# Altium PCB DB32.PcbDoc (part 6 of 8)
Units mil, origin at the board's own origin, x right, y up, seen from the top; angles counter-clockwise.
Board outline 3236.22 x 4456.69 mil, 8 copper layers (Top Layer, MidLayer1, MidLayer2, GND-Layer5, MidLayer3, VCC, MidLayer4, Bottom Layer), stack 61.8 mil thick; 207 components, 474 nets, 1777 pads, 1474 vias.
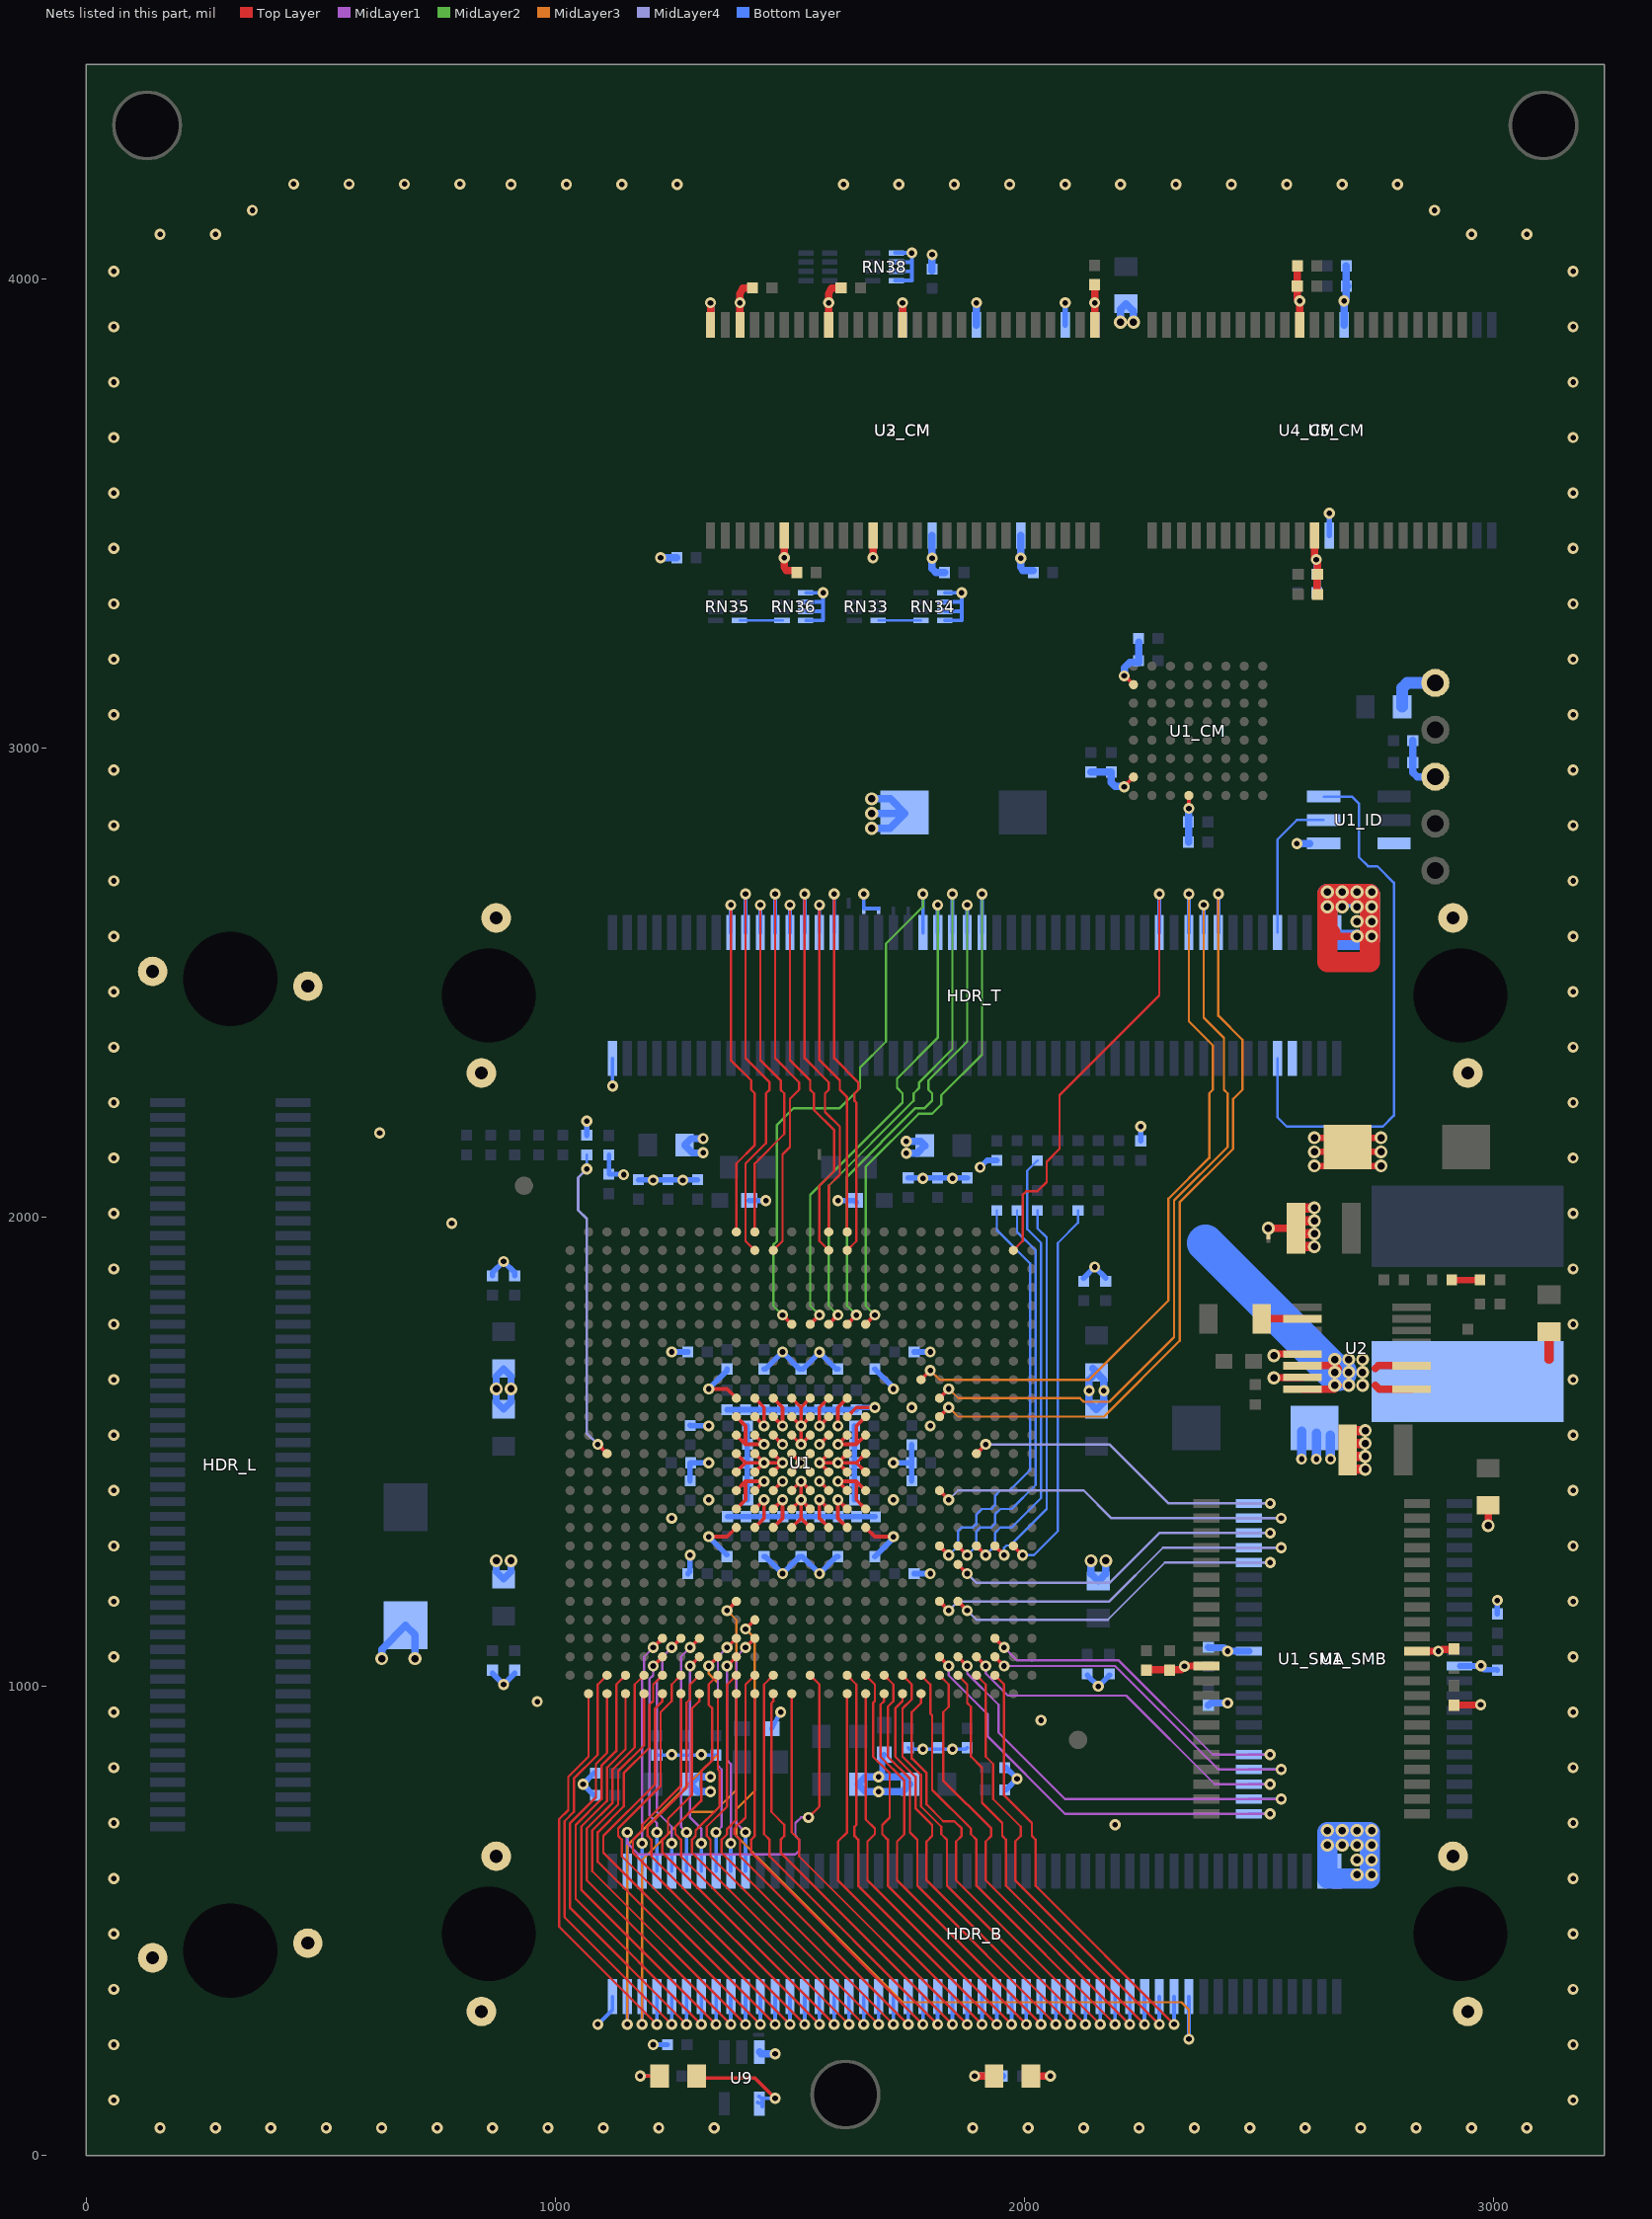
[diagram p12: the nets of this part, all layers, seen from the top]

## Via types
v1: diameter 23.62, hole 11.81, Top Layer to Bottom Layer, 839 vias
v2: diameter 23.62, hole 11.81, Top Layer to Bottom Layer, tented both sides, 499 vias
v3: diameter 27.56, hole 15.75, Top Layer to Bottom Layer, 135 vias
v4: diameter 23.62, hole 11.81, Top Layer to Bottom Layer, tented top, 1 vias

## Nets (pads, with @x,y where several pads share a name; then routed paths per layer and width w, separated by ;. In a path a pad name is that pad's centre, name@x,y a point inside that pad or via, vN(x,y) a via of type N, cw(c..) or ccw(c..) an arc to the next point about the centre after c; other vN are vias at no path point) (continued)
GND: C1_CM.2 C1_FP.2 C1_ID.1 C1_MB.2 C1_PL.2 C1_SMA.2 C1_SMB.2 C2_CM.2 C2_FP.2 C2_ID.2 C2_MB.2 C2_PL.2 C2_SMA.2 C2_SMB.2 C3_CM.2 C3_FP.2 C3_PL.2 C3_SMA.2 C3_SMB.2 C4_CM.2 C4_FP.2 C4_PL.2 C4_SMA.2 C4_SMB.2 C5_CM.2 C5_FP.2 C5_MB.2 C5_PL.2 C6_CM.2 C6_FP.2 C6_PL.2 C7_CM.2 C7_FP.2 C7_PL.2 C8_CM.2 C8_FP.2 C8_PL.2 C9_CM.2 C9_FP.2 C9_PL.2 C10_CM.2 C10_FP.2 C10_PL.2 C11_CM.2 C11_FP.2 C11_PL.2 C12_CM.2 C12_FP.2 C12_PL.2 C13_CM.2 C13_PL.2 C14_CM.2 C14_PL.2 C15.2 C15_CM.2 C15_FP.2 C15_PL.2 C16_CM.2 C16_FP.2 C16_PL.2 C17.2 C17_CM.2 C17_FP.2 C18_CM.2 C18_FP.2 C19.2 C19_CM.2 C19_FP.2 C20.2 C20_CM.2 C20_FP.2 C21_CM.2 C21_FP.2 C22.2 C22_CM.2 C22_FP.2 C23_CM.2 C23_FP.2 C24_CM.2 C24_FP.2 C25_FP.2 C38_FP.2 C39_FP.2 C40_FP.2 C41_FP.2 C42_FP.2 C43_FP.2 C44_FP.2 C45_FP.2 C46_FP.2 C47_FP.2 C48_FP.2 C49_FP.2 C50_FP.2 C51_FP.2 C52_FP.2 C53_FP.2 C54_FP.2 C55_FP.2 C56_FP.2 C62_FP.2 C63_FP.2 C64_FP.2 C65_FP.2 C66_FP.2 C67_FP.2 C68_FP.2 C69_FP.2 C70_FP.2 C71_FP.2 C72_FP.2 C73_FP.2 C74_FP.2 C75_FP.2 C76_FP.2 C77_FP.2 C78_FP.2 C79_FP.2 C80_FP.2 C81_FP.2 C82_FP.2 C83_FP.2 C84_FP.2 C85_FP.2 C86_FP.2 C87_FP.2 C88_FP.2 C89_FP.2 C90_FP.2 C91_FP.2 C92_FP.2 C93_FP.2 C98.1 HDR_B.1 HDR_B.98 HDR_B.100 HDR_B.MH1 HDR_B.MH2 HDR_B.MH3 HDR_B.MH4 HDR_L.MH1 HDR_L.MH2 HDR_L.MH3 HDR_L.MH4 HDR_T.1 HDR_T.98 HDR_T.100 HDR_T.MH1 HDR_T.MH2 HDR_T.MH3 HDR_T.MH4 LED1.2 NT4.2 NT5.2 NT7.2 R5.2 RN34.1 RN34.2 RN34.3 RN34.4 RN36.1 RN36.2 RN36.3 RN36.4 RN38.1 RN38.2 RN38.3 RN38.4 TP0.1 TP2.1 U1.K10 U1.K11 U1.K12 U1.K13 U1.K14 U1.K15 U1.K16 U1.L10 U1.L11 U1.L12 U1.L13 U1.L14 U1.L15 U1.L16 U1.L17 U1.M10 U1.M11 U1.M12 U1.M13 U1.M14 U1.M15 U1.M16 U1.M17 U1.N10 U1.N11 U1.N12 U1.N13 U1.N14 U1.N15 U1.N16 U1.N17 U1.P10 U1.P11 U1.P12 U1.P13 U1.P14 U1.P15 U1.P16 U1.P17 U1.R10 U1.R11 U1.R12 U1.R13 U1.R14 U1.R15 U1.R16 U1.R17 U1.T10 U1.T11 U1.T12 U1.T13 U1.T14 U1.T15 U1.T16 U1.T17 U1.U10 U1.U11 U1.U12 U1.U13 U1.U14 U1.U15 U1.U16 U1.U17 U1_CM.E8 U1_CM.H2 U1_CM.H7 U1_ID.1 U1_SMA.12 U1_SMA.34 U1_SMB.12 U1_SMB.34 U2.13 U2.15 U2_CM.6 U2_CM.12 U2_CM.28 U2_CM.41 U2_CM.46 U2_CM.52 U2_CM.54 U3_CM.6 U3_CM.12 U3_CM.28 U3_CM.41 U3_CM.46 U3_CM.52 U3_CM.54 U4_CM.12 U4_CM.34 U5_CM.12 U5_CM.34 U9.3 | length 14104.8
  Top Layer w7.87: v1(1326.77,1318.9) 1366.14,1318.9 U1.U10@1385.83,1338.58 ; v1(1326.77,1633.86) 1366.14,1633.86 U1.K10@1385.83,1614.17 ; U1.T10@1385.83,1377.95 1405.51,1397.64 1405.51,1437.01 ; U1.R10@1385.83,1417.32 1405.51,1437.01 ; U1.P10@1385.83,1456.69 1405.51,1476.38 ; U1.N10@1385.83,1496.06 1405.51,1476.38 ; U1.M10@1385.83,1535.43 1405.51,1515.75 ; U1.L10@1385.83,1574.8 1405.51,1555.12 1405.51,1515.75 ; U1.U11@1425.2,1338.58 1444.88,1358.27 v1(1444.88,1397.64) U1.T11@1425.2,1377.95 ; U1.R11@1425.2,1417.32 v1(1444.88,1437.01) 1405.51,1437.01 ; U1.P11@1425.2,1456.69 v1(1444.88,1476.38) ; U1.N11@1425.2,1496.06 v1@1444.88,1476.38 ; U1.M11@1425.2,1535.43 v1(1444.88,1515.75) 1405.51,1515.75 ; U1.L11@1425.2,1574.8 v1(1444.88,1555.12) 1444.88,1594.49 U1.K11@1425.2,1614.17 ; U1.U12@1464.57,1338.58 1484.25,1358.27 v1(1484.25,1397.64) U1.T12@1464.57,1377.95 ; U1.R12@1464.57,1417.32 v1(1484.25,1437.01) ; U1.P12@1464.57,1456.69 v1(1484.25,1476.38) ; U1.N12@1464.57,1496.06 v1(1484.25,1476.38) ; U1.M12@1464.57,1535.43 v1(1484.25,1515.75) ; U1.L12@1464.57,1574.8 v1(1484.25,1555.12) 1484.25,1594.49 U1.K12@1464.57,1614.17 ; U1.R13@1503.94,1417.32 v1(1523.62,1437.01) ; U1.P13@1503.94,1456.69 U1.N14@1543.31,1496.06 ; U1.N13@1503.94,1496.06 U1.P14@1543.31,1456.69 ; U1.M13@1503.94,1535.43 v1(1523.62,1515.75) ; U1.L13@1503.94,1574.8 v1(1523.62,1555.12) U1.L14@1543.31,1574.8 ; U1.K13@1503.94,1614.17 1523.62,1594.49 ; U1.U14@1543.31,1338.58 1523.62,1358.27 ; U1.T14@1543.31,1377.95 v1(1523.62,1397.64) ; U1.R14@1543.31,1417.32 v1(1523.62,1437.01) ; U1.M14@1543.31,1535.43 v1(1523.62,1515.75) ; U1.K14@1543.31,1614.17 1523.62,1594.49 ; v1(1562.99,1437.01) U1.R15@1582.68,1417.32 ; v1(1562.99,1515.75) U1.M15@1582.68,1535.43 ; U1.U15@1582.68,1338.58 1562.99,1358.27 v1(1562.99,1397.64) U1.T15@1582.68,1377.95 ; U1.P15@1582.68,1456.69 v1(1562.99,1476.38) ; U1.N15@1582.68,1496.06 v1(1562.99,1476.38) ; U1.L15@1582.68,1574.8 v1(1562.99,1555.12) 1562.99,1594.49 U1.K15@1582.68,1614.17 ; v1(1602.36,1555.12) 1602.36,1594.49 U1.K16@1622.05,1614.17 ; U1.U16@1622.05,1338.58 1602.36,1358.27 v1(1602.36,1397.64) U1.T16@1622.05,1377.95 ; U1.R16@1622.05,1417.32 v1(1602.36,1437.01) 1641.73,1437.01 ; U1.P16@1622.05,1456.69 v1(1602.36,1476.38) ; U1.N16@1622.05,1496.06 v1@1602.36,1476.38 ; U1.M16@1622.05,1535.43 v1(1602.36,1515.75) 1641.73,1515.75 ; U1.L16@1622.05,1574.8 1641.73,1594.49 v1(1681.1,1594.49) ; U1.U17@1661.42,1338.58 1681.1,1318.9 v1(1720.47,1318.9) ; U1.T17@1661.42,1377.95 1641.73,1397.64 1641.73,1437.01 ; U1.R17@1661.42,1417.32 1641.73,1437.01 ; U1.P17@1661.42,1456.69 1641.73,1476.38 ; U1.N17@1661.42,1496.06 1641.73,1476.38 ; U1.M17@1661.42,1535.43 1641.73,1515.75 ; U1.L17@1661.42,1574.8 1641.73,1555.12 1641.73,1515.75 ; v1@2212.6,2918.31 U1_CM.H7@2232.28,2937.99 ; v1@2212.6,3154.53 U1_CM.H2@2232.28,3134.84 ; v1(2350.4,2871.07) U1_CM.E8@2350.39,2898.62 ; 1405.51,1476.38 v1(1444.88,1476.38) ; 1405.51,1476.38 v1@1444.88,1476.38 ; v1@1444.88,1476.38 v1(1484.25,1476.38) ; 1523.62,1358.27 v1(1523.62,1397.64) ; 1523.62,1358.27 U1.U13@1503.94,1338.58 1523.62,1358.27 ; v1(1523.62,1397.64) U1.T13@1503.94,1377.95 v1(1523.62,1397.64) ; v1(1523.62,1397.64) v1(1523.62,1437.01) ; v1(1523.62,1515.75) 1523.62,1594.49 ; v1(1562.99,1476.38) 1641.73,1476.38 ; v1@1602.36,1476.38 1641.73,1476.38
  Top Layer w13.78: v3(2618.11,2109.29) C17.2@2669.08,2109.29 ; v3(2618.11,2139.29) C17.2@2669.08,2139.29 ; v3(2618.11,2169.29) 2669.08,2169.29 C17.2@2689.05,2149.33 C17.2@2673.58,2133.85 ; C17.2@2709.01,2109.29 v3(2759.99,2109.29) ; C17.2@2709.01,2139.29 v3(2759.99,2139.29) ; C17.2@2709.01,2169.29 v3(2759.99,2169.29)
  Top Layer w15: C4_SMA.2@2259.84,1034.45 2260.82,1035.43 2334.65,1035.43 2341,1041.79 v1(2341,1043) 2341.3,1043.3 U1_SMA.34@2387.87,1043.31 ; v3(2531.5,1657.48) 2532.26,1658.25 U2.15@2591.08,1658.25 ; v3(2531.5,1704.72) 2535.43,1708.66 U2.13@2590.55,1708.66 ; U1_SMA.12@2836.69,1074.8 2881.8,1074.8 v1(2882,1075) 2886.02,1075 2889.76,1078.74 2914.47,1078.74 C1_SMA.2@2915.44,1079.71 ; C3_SMA.2@2915.3,957.92 2917.32,957.76 2914.45,960.63 v1(2972.44,960.63)
  Top Layer w15.75: U2_CM.54@1330.71,3901.57 v2(1330.71,3948.82) ; U2_CM.52@1393.7,3901.57 v2(1393.7,3948.82) ; v2@1393.7,3944.88 1393.7,3964.57 ; 1393.7,3968.51 1399.61,3980.32 C7_CM.2@1420.27,3980.31 ; C7_CM.2@1416.34,3980.32 C7_CM.2@1418.31,3978.34 ; U2_CM.6@1488.19,3452.76 1488.19,3409.45 v2(1488.19,3405.51) 1488.19,3385.83 1492.13,3377.95 C10_CM.2@1514.76,3377.95 ; U2_CM.46@1582.68,3901.57 v2(1582.68,3948.82) ; v2@1582.68,3944.88 1582.68,3964.57 1582.68,3968.51 1588.58,3980.32 C8_CM.2@1609.25,3980.31 ; v2(1677.17,3405.51) U2_CM.12@1677.17,3452.76 ; U2_CM.41@1740.16,3901.57 v2(1740.16,3948.82) ; LED1.2@2011.81,169.29 v1(2055.12,169.29) ; U2_CM.28@2149.61,3901.57 C9_CM.2@2149.6,3987.2 ; v3(2519.68,1976.38) C15.2@2582.67,1976.38 ; C16_CM.2@2581.69,4027.55 2581.69,3957.68 v2(2586.61,3952.76) U4_CM.34@2586.61,3901.57 ; U4_CM.12@2618.11,3452.76 2618.11,3405.51 2624.72,3398.9 C17_CM.2@2624.72,3370.07 C17_CM.2@2625.71,3371.06 ; C15_CM.2@2623.74,3329.72 C17_CM.2@2623.74,3370.07 ; 2645.67,2598.43 v3(2708.66,2598.43) ; v3(2988.19,1342.52) C19.2@2988.18,1385.82
  Top Layer w19.68: 2645.67,2551.18 2649.61,2555.12 ; 3118.09,1696.83 C22.2@3118.1,1755.9
  Top Layer w20: C15.2@2578.73,1937 v3(2618.1,1937) ; C15.2@2578.73,1964.56 v3(2618.1,1964.56) ; C15.2@2578.73,1992.12 v3(2618.1,1992.12) ; C15.2@2578.73,2019.68 v3(2618.1,2019.68) ; C20.2@2687.01,1462.59 v3(2726.38,1462.59) ; C20.2@2687.01,1490.15 v3(2726.38,1490.15) ; C20.2@2687.01,1517.71 v3(2726.38,1517.71) ; C20.2@2687.01,1545.27 v3(2726.38,1545.27)
  Top Layer w39.37: 2645.67,2606.3 2653.54,2606.3
  Top Layer w43.31: 2645.67,2547.24 2649.61,2543.31 ; 2645.67,2543.31 2736.22,2543.31 2736.22,2688.98 2645.67,2688.98 2645.67,2543.31
  Bottom Layer w5: v2@1121.06,2278.54 v2(1122.05,2279.53)
  Bottom Layer w7.87: v2(1090.55,279.53) 1122.05,311.02 HDR_B.1@1122.05,338.58 ; v2(1122.05,2279.53) HDR_T.1@1122.05,2338.58 ; C4_PL.2@1216.53,853.34 C2_PL.2@1342.52,853.34 ; RN36.4@1534.64,3271.65 1570.87,3271.65 v1(1570.87,3330.71) RN36.1@1534.64,3330.71 ; RN36.3@1534.64,3291.34 1570.87,3291.34 ; RN36.2@1534.64,3311.02 1570.87,3311.02 ; v2(1657.48,2688.98) 1657.48,2657.48 NT4.2@1688.98,2657.48 ; RN38.4@1723.62,3996.06 1759.84,3996.06 v1(1759.84,4055.12) RN38.1@1723.62,4055.12 ; RN38.3@1723.62,4015.75 1759.84,4015.75 ; RN38.2@1723.62,4035.43 1759.84,4035.43 ; C14_PL.2@1751.97,869.09 1754.92,866.14 1875,866.14 C16_PL.2@1877.95,869.09 ; RN34.4@1829.92,3271.65 1866.14,3271.65 v1(1866.14,3330.71) RN34.1@1829.92,3330.71 ; RN34.3@1829.92,3291.34 1866.14,3291.34 ; RN34.2@1829.92,3311.02 1866.14,3311.02
  Bottom Layer w9.84: C81_FP.2@1114.17,2132.87 C80_FP.2@1114.17,2091.53 1144.69,2091.53 v1(1145.67,2090.55) ; v1(1208.66,236.22) C98.1@1239.17,236.22 ; C1_PL.2@1460.63,909.45 v1(1480.31,944.88)
  Bottom Layer w11.81: C85_FP.2@866.14,1027.56 v2(889.76,1003.94) C84_FP.2@913.39,1027.56 ; C82_FP.2@866.14,1875 866.14,1881.89 v2(889.76,1905.51) 913.38,1881.89 C83_FP.2@913.38,1875 ; R5.2@1066.93,2174.72 v1(1066.93,2204.72) ; C86_FP.2@1082.68,767.71 v2(1059.06,791.34) C87_FP.2@1082.68,814.96 ; C12_PL.2@1177.16,2079.72 C10_PL.2@1303.15,2079.72 ; v1(1248.03,1712.6) C19_FP.2@1282.48,1712.59 ; C4_FP.2@1282.48,1240.16 1287.4,1245.08 v1(1287.4,1279.53) ; C15_FP.2@1287.4,1437.99 1287.4,1475.39 C24_FP.2@1288.38,1476.37 v1@1326.77,1476.37 ; C25_FP.2@1287.4,1556.1 1288.38,1555.12 v1(1326.77,1555.12) ; v1(1326.77,1318.9) 1365.16,1280.51 C16_FP.2@1366.14,1280.51 ; v1(1326.77,1633.86) 1366.14,1673.23 C12_FP.2@1366.14,1676.18 ; C69_FP.2@1366.14,1589.56 C64_FP.2@1641.73,1589.56 1646.65,1594.49 v1(1681.1,1594.49) ; C73_FP.2@1366.82,1361.64 C63_FP.2@1681.78,1361.64 ; C65_FP.2@1409.45,1397.63 C54_FP.2@1409.45,1555.12 ; C9_PL.2@1417.33,2035.43 C9_PL.2@1413.39,2035.43 v1(1448.82,2035.43) ; C5_FP.2@1444.88,1276.57 1447.84,1276.57 v1(1484.25,1240.16) 1520.67,1276.57 1526.58,1276.57 v1(1562.99,1240.16) 1599.41,1276.57 C6_FP.2@1602.36,1276.57 ; C23_FP.2@1444.88,1676.18 1447.83,1676.18 v1(1484.25,1712.6) 1520.67,1676.18 1527.16,1676.18 v1(1562.99,1712.01) 1598.82,1676.18 C22_FP.2@1602.36,1676.18 ; v1(1602.36,2035.43) C5_PL.2@1637.79,2035.43 ; C5_PL.2@1629.92,2035.43 C5_PL.2@1637.79,2035.43 ; C76_FP.2@1637.8,1397.64 C56_FP.2@1637.8,1555.12 ; C5_PL.2@1641.73,2031.49 C5_PL.2@1637.79,2035.43 ; C18_FP.2@1681.1,1276.57 1720.47,1315.95 v1(1720.47,1318.9) ; C10_FP.2@1681.1,1676.18 1720.47,1636.8 v1(1720.47,1633.86) ; v1(1688.98,807.09) 1696.85,814.96 1696.85,850.39 C13_PL.2@1700.78,854.33 ; v1(1720.47,1476.38) C20_FP.2@1758.85,1476.38 ; C6_PL.2@1751.97,2083.66 C8_PL.2@1877.95,2083.66 ; C8_FP.2@1759.84,1437.99 1759.84,1475.39 C20_FP.2@1758.85,1476.37 ; C9_FP.2@1759.84,1514.76 1759.84,1477.36 C20_FP.2@1758.85,1476.37 ; C7_FP.2@1764.76,1240.16 v1(1799.21,1240.16) ; C21_FP.2@1764.76,1712.6 v1(1799.21,1712.6) ; v2(1905.51,2106.3) 1920.27,2121.06 C79_FP.2@1940.94,2121.06 ; C88_FP.2@1960.63,779.53 v2(1984.25,803.15) C89_FP.2@1960.63,826.77 ; U3_CM.52@2086.61,3901.57 v2(2086.61,3948.82) ; C93_FP.2@2125.98,1870.08 v2(2149.61,1893.7) C92_FP.2@2173.23,1870.08 ; C91_FP.2@2133.86,1023.62 v2(2157.48,1000) C90_FP.2@2181.1,1023.62 ; U3_CM.54@2149.61,3901.57 v2(2149.61,3948.82) ; C78_FP.2@2248.03,2162.4 v2(2248.03,2192.91) ; U5_CM.12@2649.61,3452.76 v2(2649.61,3500) ; U1_SMB.34@2927.25,1043.3 v1@2972.3,1043.3 ; v1(2973,1044) v1@2972.3,1043.3 ; C4_SMB.2@3007.87,1034.45 3006.88,1035.43 2979.33,1035.43 2972.3,1042.47 v1@2972.3,1043.3 ; C2_SMB.2@3007.87,1154.53 v1(3007.87,1183.07)
  Bottom Layer w15: C1_MB.2@661.42,1110.59 C1_MB.2@680.83,1130 700.79,1110.04 v3(700.79,1059.06) ; v3(874.02,1267.72) 874.02,1244.09 C41_FP.2@889.76,1228.34 905.51,1244.09 v3(905.51,1267.72) ; v1@1314.96,2137.14 1291.99,2137.14 C38_FP.2@1275.59,2153.54 1289.29,2167.24 v1(1315.08,2167.24) ; v2(1330.71,775.59) 1303.15,775.59 C45_FP.2@1287.4,791.34 1303.15,807.09 v2(1330.71,807.09) ; v1@1748.03,2139.93 1748.03,2132.31 v1(1748.27,2136.26) ; v1(1748.27,2136.26) 1771.23,2136.24 C40_FP.2@1787.52,2152.54 ; C1_SMB.2@2391.82,959.64 2396.75,964.57 v1(2433.07,964.57) ; C3_SMB.2@2391.82,1083.65 2392.8,1082.68 2425.2,1082.68 v1@2432.87,1075 ; v1(2433,1075) 2433.21,1074.79 U1_SMB.12@2478.43,1074.8 ; C1_FP.2@874.02,1606.29 C1_FP.2@889.76,1590.55 905.51,1606.3 905.51,1661.41 C39_FP.2@889.76,1677.16 874.02,1661.42 C1_FP.2@874.02,1606.29 ; C2_FP.2@1645.67,791.34 1661.41,775.59 1740.16,775.59 C44_FP.2@1755.9,791.34 1740.15,807.09 1661.42,807.09 C2_FP.2@1645.67,791.34
  Bottom Layer w15.75: v3(629.92,1059.06) 629.92,1079.09 C1_MB.2@680.83,1130 ; v2(1224.41,3405.51) C13_CM.2@1258.85,3405.51 ; U3_CM.28@1330.71,3901.57 v2@1330.71,3944.88 ; U9.3@1435.04,220.47 1438.97,216.54 v1(1468.5,216.54) ; v3(1674.21,2828.74) 1713.39,2828.74 1745.15,2860.51 1713.93,2891.73 v3(1674.21,2891.73) ; v3(1674.21,2860.24) C2_MB.2@1744.88,2860.24 ; U3_CM.41@1740.16,3901.57 v2(1740.16,3948.82) ; v1(1748.03,2161.42) 1778.65,2161.42 C40_FP.2@1787.52,2152.54 ; U3_CM.12@1803.15,3452.76 1803.15,3405.51 v2(1803.15,3404.53) 1803.15,3381.89 1811.04,3374.01 C12_CM.2@1829.72,3374.01 ; C14_CM.2@1803.15,4016.72 1803.15,4047.24 v2(1803.15,4051.18) ; U3_CM.46@1897.64,3901.57 v2(1897.64,3948.82) v2@1897.64,3944.88 ; U3_CM.6@1992.13,3452.76 1992.13,3385.83 1996.06,3377.95 C11_CM.2@2018.7,3377.95 ; v3(2141.73,1267.72) 2141.73,1240.15 C43_FP.2@2157.48,1224.41 2161.42,1228.35 2173.23,1240.16 v3(2173.23,1267.72) ; C4_CM.2@2141.73,2948.82 C1_CM.2@2185.04,2948.82 2185.04,2926.19 2192.92,2918.31 v1@2212.6,2918.31 ; C42_FP.2@2145.66,1677.16 2169.29,1653.54 2169.29,1606.3 C3_FP.2@2153.54,1590.55 2137.8,1606.29 2137.8,1653.54 C42_FP.2@2153.54,1669.29 ; v3(2204.72,3907.48) 2204.72,3935.04 C24_CM.2@2216.53,3946.84 2232.28,3931.1 v3(2232.28,3907.48) ; v1(2212.6,3153.54) 2212.6,3170.28 2224.41,3182.09 2243.11,3182.09 C6_CM.2@2243.11,3225.39 ; C5_CM.2@2349.4,2799.21 2350.4,2800.2 v1(2350.4,2871.07) ; v2(2580.71,2796.26) 2608.06,2796.26 U1_ID.1@2608.25,2796.45 ; v2(2622.05,3401.57) 2623.03,3400.6 C19_CM.2@2623.03,3330.7 ; v2@2681.1,3956.7 v2(2681.1,3952.76) 2686.02,3957.67 C22_CM.2@2686.02,3984.25 ; U5_CM.34@2681.38,3901.57 v2@2681.38,3944.88 ; C20_CM.2@2686.02,4027.55 2686.02,3987.2 C22_CM.2@2688.98,3984.25 ; C1_ID.1@2827.75,3015.74 2827.75,2947.84 2836.92,2938.67 TP2.1@2875.71,2938.66
  Bottom Layer w20: v1(2590.55,1484.25) C5_MB.2@2590.55,1543.31 ; v1(2622.05,1484.25) C5_MB.2@2622.05,1539.37 ; v1(2652.34,1484.25) C5_MB.2@2652.34,1535.44
  Bottom Layer w25: C23_CM.2@2805.12,3087.59 2805.12,3127.96 2815.83,3138.67 TP0.1@2875.71,3138.67
  Bottom Layer w43.31: v3@2649.61,681.1 v3@2736.22,681.1 ; v3@2649.61,2681.1 v3@2736.22,2681.1 ; v3@2736.22,681.1 2736.22,661.42 2736.22,629.92 2736.22,598.42 2736.22,590.55 2645.67,590.55 2645.67,688.98 2736.22,688.98 v3@2736.22,681.1 ; v3@2736.22,2681.1 2736.22,2661.42 2736.22,2629.92 2736.22,2598.43 2736.22,2590.55 2645.67,2590.55 2645.67,2688.98 2736.22,2688.98 v3@2736.22,2681.1
  other v1: 157.48,59.06 275.59,59.06 393.7,59.06 511.81,59.06 629.92,59.06 748.03,59.06 866.14,59.06 984.25,59.06 1102.36,59.06 1220.47,59.06 1338.58,59.06 1889.76,59.06 2007.87,59.06 2125.98,59.06 2244.09,59.06 2362.2,59.06 2480.31,59.06 2598.43,59.06 2716.54,59.06 2834.65,59.06 2952.76,59.06 3070.87,59.06 59.06,118.11 3169.29,118.11 59.06,236.22 3169.29,236.22 59.06,354.33 3169.29,354.33 59.06,472.44 3169.29,472.44 59.06,590.55 3169.29,590.55 59.06,708.66 3169.29,708.66 1688.98,775.59 59.06,826.77 3169.29,826.77 1783.46,866.14 1846.46,866.14 59.06,944.88 3169.29,944.88 961.57,967.47 59.06,1062.99 3169.29,1062.99 59.06,1181.1 3169.29,1181.1 59.06,1299.21 3169.29,1299.21 1248.03,1358.27 1326.77,1397.64 1720.47,1397.64 59.06,1417.32 3169.29,1417.32 1326.77,1476.38 1523.62,1476.38 59.06,1535.43 3169.29,1535.43 1799.21,1555.12 1759.84,1594.49 2137.8,1629.92 2169.29,1629.92 59.06,1653.54 3169.29,1653.54 59.06,1771.65 3169.29,1771.65 59.06,1889.76 3169.29,1889.76 779.24,1986.9 59.06,2007.87 3169.29,2007.87 1208.66,2078.74 1271.65,2078.74 1783.46,2082.68 1846.46,2082.68 59.06,2125.98 3169.29,2125.98 1315.08,2137.24 625.7,2179.57 59.06,2244.09 3169.29,2244.09 59.06,2362.2 3169.29,2362.2 59.06,2480.31 3169.29,2480.32 59.06,2598.43 3169.29,2598.43 59.06,2716.54 3169.29,2716.54 59.06,2834.65 3169.29,2834.65 2212.6,2917.32 59.06,2952.76 3169.29,2952.76 59.06,3070.87 3169.29,3070.87 59.06,3188.98 3169.29,3188.98 59.06,3307.09 3169.29,3307.09 59.06,3425.2 3169.29,3425.2 59.06,3543.31 3169.29,3543.31 59.06,3661.42 3169.29,3661.42 59.06,3779.53 3169.29,3779.53 59.06,3897.64 3169.29,3897.64 59.06,4015.75 3169.29,4015.75 157.48,4094.49 275.59,4094.49 2952.76,4094.49 3070.87,4094.49 354.33,4145.67 2874.02,4145.67 905.51,4200.79 1023.62,4200.79 1141.73,4200.79 1259.84,4200.79 1614.17,4200.79 1732.28,4200.79 1850.39,4200.79 1968.5,4200.79 2086.61,4200.79 2204.72,4200.79 2322.83,4200.79 2440.94,4200.79 2559.06,4200.79 2677.17,4200.79 2795.28,4200.79 442.21,4201.8 560.32,4201.8 678.43,4201.8 796.54,4201.8
  other v2: 2193.14,704.91 1248.03,854.33 1311.02,854.33 2035.41,927.64 1992.13,3404.53
  other v3: 2708.66,598.42 2740.16,598.42 2708.66,629.92 2740.16,629.92 2645.67,661.42 2677.17,661.42 2708.66,661.42 2740.16,661.42 2645.67,692.91 2677.17,692.91 2708.66,692.91 2740.16,692.91 874.02,1633.86 905.51,1633.86 2740.16,2598.43 2708.66,2629.92 2740.16,2629.92 2645.67,2661.42 2677.17,2661.42 2708.66,2661.42 2740.16,2661.42 2645.67,2692.91 2677.17,2692.91 2708.66,2692.91 2740.16,2692.91
INITN: R8.2 U1.V25 | length 825.3
  Top Layer w7.87: U1.V25@1976.38,1299.21 v1(1996.07,1279.53)
  Bottom Layer w5: v1(1996.07,1279.53) 2019.68,1279.53 2070.87,1330.71 2070.87,1944.88 2114.17,1988.18 R8.2@2114.17,2014.25
IO0: HDR_B.7 U1.AF2 | length 876.3
  Top Layer w5: U1.AF2@1070.87,984.25 1070.87,921.26 1070.87,909.45 1070.87,850.39 1027.56,807.09 1027.56,736.22 1007.87,716.54 1007.87,488.19 v2(1216.54,279.53)
  Bottom Layer w7.87: v2(1216.54,279.53) HDR_B.7@1216.54,338.58
IO1: HDR_B.9 U1.AE3 | length 935.2
  Top Layer w5: U1.AE3@1110.24,1023.62 1090.55,1003.94 1090.55,921.26 1090.55,909.45 1090.55,854.33 1039.37,803.15 1039.37,732.28 1019.68,712.6 1019.68,507.87 v2(1248.03,279.53)
  Bottom Layer w7.87: v2(1248.03,279.53) HDR_B.9@1248.03,338.58
IO2: HDR_B.11 U1.AF3 | length 899.1
  Top Layer w5: U1.AF3@1110.24,984.25 1110.24,921.26 1110.24,909.45 1110.24,858.27 1086.61,834.65 1086.61,763.78 1031.5,708.66 1031.5,527.56 v2(1279.53,279.53)
  Bottom Layer w7.87: v2(1279.53,279.53) HDR_B.11@1279.53,338.58
IO3: HDR_B.13 U1.AE4 | length 958.1
  Top Layer w5: U1.AE4@1149.61,1023.62 1129.92,1003.94 1129.92,983.27 1129.92,941.93 1129.92,921.26 1129.92,909.45 1129.92,862.2 1098.43,830.71 1098.43,759.84 1043.31,704.72 1043.31,547.24 v2(1311.02,279.53)
  Bottom Layer w7.87: v2(1311.02,279.53) HDR_B.13@1311.03,338.58
IO4: HDR_B.15 U1.AF4 | length 922
  Top Layer w5: U1.AF4@1149.61,984.25 1149.61,921.26 1149.61,909.45 1149.61,866.14 1110.24,826.77 1110.24,755.91 1055.12,700.79 1055.12,566.93 v2(1342.52,279.53)
  Bottom Layer w7.87: v2(1342.52,279.53) HDR_B.15@1342.52,338.58
IO5: HDR_B.17 U1.AE5 | length 980.9
  Top Layer w5: U1.AE5@1188.98,1023.62 1169.29,1003.94 1169.29,983.27 1169.29,941.93 1169.29,921.26 1169.29,909.45 1169.29,870.08 1122.05,822.83 1122.05,751.97 1066.93,696.85 1066.93,586.61 v2(1374.02,279.53)
  Bottom Layer w7.87: v2(1374.02,279.53) HDR_B.17@1374.02,338.58
IO6: HDR_B.19 U1.AF5 | length 944.8
  Top Layer w5: U1.AF5@1188.98,984.25 1188.98,921.26 1188.98,909.45 1188.98,874.02 1133.86,818.9 1133.86,748.03 1078.74,692.91 1078.74,606.3 v2(1405.51,279.53)
  Bottom Layer w7.87: v2(1405.51,279.53) HDR_B.19@1405.51,338.58
IO7: HDR_B.21 U1.AE6 | length 1003.7
  Top Layer w5: U1.AE6@1228.35,1023.62 1208.66,1003.94 1208.66,968.5 1200.79,960.63 1200.79,921.26 1200.79,909.45 1200.79,870.08 1145.67,814.96 1145.67,744.09 1090.55,688.98 1090.55,625.98 v2(1437.01,279.53)
  Bottom Layer w7.87: v2(1437.01,279.53) HDR_B.21@1437.01,338.58
IO8: HDR_B.23 U1.AF6 | length 967.6
  Top Layer w5: U1.AF6@1228.35,984.25 1228.35,968.5 1212.6,952.75 1212.6,921.26 1212.6,909.45 1212.6,791.34 1102.36,681.1 1102.36,645.67 v2(1468.5,279.53)
  Bottom Layer w7.87: v2(1468.5,279.53) HDR_B.23@1468.51,338.58
IO9: HDR_B.25 U1.AE7 | length 1010.3
  Top Layer w5: U1.AE7@1267.72,1023.62 1248.03,1003.94 1248.03,968.5 1224.41,944.88 1224.41,921.26 1224.41,909.45 1224.41,787.4 1133.86,696.85 1133.86,681.1 1141.73,673.23 1141.73,637.79 v2(1500,279.53)
  Bottom Layer w7.87: v2(1500,279.53) HDR_B.25@1500,338.58
IO10: HDR_B.27 U1.AF7 | length 957.8
  Top Layer w5: U1.AF7@1267.72,984.25 1267.72,921.26 1267.72,909.45 1267.72,787.4 1185.04,704.72 1185.04,692.91 1165.35,673.23 1165.35,645.67 v2(1531.5,279.53)
  Bottom Layer w7.87: v2(1531.5,279.53) HDR_B.27@1531.5,338.58
IO11: HDR_B.29 U1.AE8 | length 1000.5
  Top Layer w5: U1.AE8@1307.09,1023.62 1287.4,1003.94 1287.4,983.27 1287.4,972.93 1279.53,965.06 1279.53,921.26 1279.53,909.45 1279.53,783.71 1196.85,701.03 1196.85,681.1 1204.72,673.23 1204.72,637.79 v2(1562.99,279.53)
  Bottom Layer w7.87: v2(1562.99,279.53) HDR_B.29@1562.99,338.58
IO12: HDR_B.31 U1.AF8 | length 948.1
  Top Layer w5: U1.AF8@1307.09,984.25 1307.09,968.5 1291.34,952.75 1291.34,921.26 1291.34,909.45 1291.34,768.7 1240.16,717.52 1240.16,685.04 1228.35,673.23 1228.35,645.67 v2(1594.49,279.53)
  Bottom Layer w7.87: v2(1594.49,279.53) HDR_B.31@1594.49,338.58
IO13: HDR_B.33 U1.AE9 | length 1000.5
  Top Layer w5: U1.AE9@1346.46,1023.62 1326.77,1003.94 1326.77,960.63 1334.65,952.76 1334.65,921.26 1334.64,909.45 1334.64,842.52 1311.02,818.9 1311.02,755.91 1255.91,700.79 1255.91,685.04 1267.72,673.23 1267.72,637.79 v2(1625.99,279.53)
  Bottom Layer w7.87: v2(1625.99,279.53) HDR_B.33@1625.99,338.58
IO14: HDR_B.35 U1.AF9 | length 941.5
  Top Layer w5: U1.AF9@1346.46,984.25 1346.46,921.26 1346.46,909.45 1346.46,822.83 1350.39,818.9 1350.39,744.09 1299.21,692.91 1299.21,681.1 1291.34,673.23 1291.34,645.67 v2(1657.48,279.53)
  Bottom Layer w7.87: v2(1657.48,279.53) HDR_B.35@1657.48,338.58
IO15: HDR_B.37 U1.AE10 | length 980.9
  Top Layer w5: U1.AE10@1385.83,1023.62 1366.14,1003.94 1366.14,921.26 1366.14,909.45 1366.14,744.09 1322.83,700.79 1322.83,681.1 1330.71,673.23 1330.71,637.79 v2(1688.98,279.53)
  Bottom Layer w7.87: v2(1688.98,279.53) HDR_B.37@1688.98,338.58
IO16: HDR_B.39 U1.AF10 | length 928.5
  Top Layer w5: U1.AF10@1385.83,984.25 1385.83,921.26 1385.83,909.45 1385.83,715.92 1366.14,696.24 1366.14,685.04 1354.33,673.23 1354.33,645.67 v2(1720.47,279.53)
  Bottom Layer w7.87: v2(1720.47,279.53) HDR_B.39@1720.48,338.58
IO17: HDR_B.41 U1.AE11 | length 974.4
  Top Layer w5: U1.AE11@1425.2,1023.62 1405.51,1003.93 1405.51,921.26 1405.51,909.45 1405.51,720.47 1381.89,696.85 1381.89,685.04 1393.7,673.23 1393.7,637.79 v2(1751.97,279.53)
  Bottom Layer w7.87: v2(1751.97,279.53) HDR_B.41@1751.97,338.58
IO18: HDR_B.43 U1.AF11 | length 918.7
  Top Layer w5: U1.AF11@1425.2,984.25 1425.2,921.26 1425.2,909.45 1425.2,681.1 1417.32,673.23 1417.32,645.67 v2(1783.47,279.53)
  Bottom Layer w7.87: v2(1783.47,279.53) HDR_B.43@1783.47,338.58
IO19: HDR_B.45 U1.AE12 | length 964.6
  Top Layer w5: U1.AE12@1464.57,1023.62 1444.88,1003.94 1444.88,921.26 1444.88,909.45 1444.88,685.04 1456.69,673.23 1456.69,637.79 v2(1814.96,279.53)
  Bottom Layer w7.87: v2(1814.96,279.53) HDR_B.45@1814.96,338.58
IO20: HDR_B.47 U1.AF12 | length 931.8
  Top Layer w5: U1.AF12@1464.57,984.25 1464.57,968.5 1460.63,964.57 1460.63,921.26 1460.63,909.45 1460.63,732.28 1488.19,704.72 1488.19,681.1 1480.31,673.23 1480.31,645.67 v2(1846.46,279.53)
  Bottom Layer w7.87: v2(1846.46,279.53) HDR_B.47@1846.46,338.58
IO21: HDR_B.49 U1.AF13 | length 918.7
  Top Layer w5: U1.AF13@1503.94,984.25 1503.94,921.26 1503.94,909.45 1503.94,688.98 1519.69,673.23 1519.69,637.79 v2(1877.95,279.53)
  Bottom Layer w7.87: v2(1877.95,279.53) HDR_B.49@1877.96,338.58
IO22: HDR_B.51 U1.AF16 | length 899.1
  Top Layer w5: U1.AF16@1622.05,984.25 1622.05,921.26 1622.05,909.45 1622.05,688.98 1602.36,669.29 1602.36,586.61 v2(1909.45,279.53)
  Bottom Layer w7.87: v2(1909.45,279.53) HDR_B.51@1909.45,338.58
IO23: HDR_B.53 U1.AE16 | length 938.5
  Top Layer w5: U1.AE16@1622.05,1023.62 1641.73,1003.93 1641.73,921.26 1641.73,909.45 1641.73,704.72 1637.8,700.79 1637.8,681.1 1645.67,673.23 1645.67,574.8 v2(1940.95,279.53)
  Bottom Layer w7.87: v2(1940.95,279.53) HDR_B.53@1940.95,338.58
IO24: HDR_B.55 U1.AF17 | length 905.7
  Top Layer w5: U1.AF17@1661.42,984.25 1661.42,921.26 1661.42,909.45 1661.42,716.54 1681.1,696.85 1681.1,685.04 1665.35,669.29 1665.35,586.61 v2(1972.44,279.53)
  Bottom Layer w7.87: v2(1972.44,279.53) HDR_B.55@1972.44,338.58
IO25: HDR_B.57 U1.AE17 | length 961.3
  Top Layer w5: U1.AE17@1661.42,1023.62 1681,1004.04 1681,968.4 1677.17,964.57 1677.17,921.26 1677.17,909.45 1677.17,850.39 1712.6,814.96 1712.6,720.47 1696.85,704.72 1696.85,685.04 1708.66,673.23 1708.66,574.8 v2(2003.94,279.53)
  Bottom Layer w7.87: v2(2003.94,279.53) HDR_B.57@2003.94,338.58
IO26: HDR_B.59 U1.AF18 | length 922
  Top Layer w5: U1.AF18@1700.79,984.25 1700.79,968.5 1692.91,960.63 1692.91,921.26 1692.91,909.45 1692.91,850.39 1744.09,799.21 1744.09,685.04 1728.35,669.29 1728.35,586.61 v2(2035.43,279.53)
  Bottom Layer w7.87: v2(2035.43,279.53) HDR_B.59@2035.44,338.58
IO27: HDR_B.61 U1.AE18 | length 964.6
  Top Layer w5: U1.AE18@1700.79,1023.62 1720.47,1003.94 1720.47,968.5 1708.66,956.69 1708.66,921.26 1708.66,909.45 1708.66,850.39 1755.91,803.15 1755.91,688.98 1771.65,673.23 1771.65,574.8 v2(2066.93,279.53)
  Bottom Layer w7.87: v2(2066.93,279.53) HDR_B.61@2066.93,338.58
IO28: HDR_B.63 U1.AF19 | length 935
  Top Layer w5: U1.AF19@1740.16,984.25 1740.16,968.51 1724.41,952.76 1724.41,921.26 1724.41,909.45 1724.41,850.39 1767.72,807.09 1767.72,740.16 1803.15,704.72 1803.15,681.1 1791.34,669.29 1791.34,586.61 v2(2098.43,279.53)
  Bottom Layer w7.87: v2(2098.43,279.53) HDR_B.63@2098.43,338.58
IO29: HDR_B.65 U1.AE19 | length 980.9
  Top Layer w5: U1.AE19@1740.16,1023.62 1759.84,1003.94 1759.84,972.44 1740.16,952.76 1740.16,921.26 1740.16,909.45 1740.16,850.39 1779.53,811.02 1779.53,744.09 1822.83,700.79 1822.83,685.04 1834.65,673.23 1834.65,574.8 v2(2129.92,279.53)
  Bottom Layer w7.87: v2(2129.92,279.53) HDR_B.65@2129.92,338.58
IO30: HDR_B.67 U1.AF20 | length 961.9
  Top Layer w5: U1.AF20@1779.53,984.25 1779.53,964.57 1759.84,944.88 1759.84,921.26 1759.84,909.45 1759.84,846.46 1791.34,814.96 1791.34,748.03 1826.77,712.6 1850.39,712.6 1866.14,696.85 1866.14,681.1 1854.33,669.29 1854.33,586.61 v2(2161.42,279.53)
  Bottom Layer w7.87: v2(2161.42,279.53) HDR_B.67@2161.42,338.58
IO31: HDR_B.69 U1.AE20 | length 974.4
  Top Layer w5: U1.AE20@1779.53,1023.62 1799.21,1003.94 1799.21,941.93 1803.15,937.99 1803.15,921.26 1803.15,909.45 1803.15,779.53 1885.83,696.85 1885.83,685.04 1897.64,673.23 1897.64,574.8 v2(2192.91,279.53)
  Bottom Layer w7.87: v2(2192.91,279.53) HDR_B.69@2192.92,338.58
IO32: HDR_B.71 U1.AE21 | length 990.8
  Top Layer w5: U1.AE21@1818.9,1023.62 1838.58,1003.94 1838.58,983.27 1838.58,956.69 1826.77,944.88 1826.77,921.26 1826.59,909.45 1826.59,799.4 1929.13,696.85 1929.13,681.1 1917.32,669.29 1917.32,586.61 v2(2224.41,279.53)
  Bottom Layer w7.87: v2(2224.41,279.53) HDR_B.71@2224.41,338.58
IO33: HDR_B.73 U1.AE22 | length 967.8
  Top Layer w5: U1.AE22@1858.27,1023.62 1877.95,1003.93 1877.95,964.57 1885.83,956.69 1885.83,921.26 1886.07,909.69 1886.07,850.15 1909.45,826.77 1909.45,751.97 1952.75,708.66 1952.75,681.1 1960.63,673.23 1960.63,574.8 v2(2255.91,279.53)
  Bottom Layer w7.87: v2(2255.91,279.53) HDR_B.73@2255.91,338.58
IO34: HDR_B.75 U1.AE23 | length 974.4
  Top Layer w5: U1.AE23@1897.64,1023.62 1917.32,1003.94 1917.32,921.26 1917.32,909.45 1917.32,850.39 1933.07,834.65 1933.07,759.84 1992.12,700.79 1992.12,681.1 1980.31,669.29 1980.31,586.61 v2(2287.4,279.53)
  Bottom Layer w7.87: v2(2287.4,279.53) HDR_B.75@2287.41,338.58
IO35: HDR_B.77 U1.AE24 | length 961.3
  Top Layer w5: U1.AE24@1937.01,1023.62 1956.69,1003.94 1956.69,988.19 1956.69,921.26 1956.69,909.45 1956.69,767.72 2015.75,708.66 2015.75,681.1 2023.62,673.23 2023.62,574.8 v2(2318.9,279.53)
  Bottom Layer w7.87: v2(2318.9,279.53) HDR_B.77@2318.9,338.58
KBCLOCK: HDR_T.26 U1.B15 | length 855.8
  Top Layer w5: v2(1500,2665.35) 1500,2334.64 1543.31,2291.34 1543.31,2271.65 1551.18,2263.78 1551.18,2228.35 1594.49,2185.04 1594.49,2098.43 1562.5,2066.44 1562.5,2042.32 1562.99,2031.5 1562.99,1948.82 U1.B15@1582.68,1929.13
  Bottom Layer w7.87: HDR_T.26@1500,2606.3 v2(1500,2665.35)
KBDATA: HDR_T.28 U1.A15 | length 850.5
  Top Layer w5: v2(1531.5,2688.98) 1531.49,2338.58 1582.68,2287.4 1582.68,2271.65 1574.8,2263.78 1574.8,2224.41 1606.3,2192.91 1606.3,2090.55 1582.68,2066.93 1582.68,2043.31 1582.68,2031.49 U1.A15@1582.68,1968.5
  Bottom Layer w7.87: HDR_T.28@1531.5,2606.3 v2(1531.5,2688.98)
LED0: HDR_B.6 U1.AC6 | length 514
  Top Layer w7.87: v1(1208.66,1082.68) U1.AC6@1228.35,1102.36
  MidLayer1 w5: v2(1185.04,665.35) 1185.04,909.45 1185.04,921.26 1185.04,1019.68 1188.98,1023.62 1188.98,1062.99 v1(1208.66,1082.68)
  Bottom Layer w7.87: HDR_B.6@1185.04,606.3 v2(1185.04,665.35)
LED1: HDR_B.8 U1.AD6 | length 474.6
  Top Layer w7.87: v1(1208.66,1043.31) U1.AD6@1228.35,1062.99
  MidLayer1 w5: v1(1208.66,1043.31) 1208.66,1023.62 1200.79,1015.75 1200.79,921.26 1200.79,909.45 1200.79,724.41 1216.54,708.66 v2(1216.54,688.98)
  Bottom Layer w7.87: HDR_B.8@1216.54,606.3 v2(1216.54,688.98)
LED2: HDR_B.10 U1.AC7 | length 530.3
  Top Layer w7.87: v1(1248.03,1082.68) U1.AC7@1267.72,1102.36
  MidLayer1 w5: v2(1248.03,665.35) 1248.03,700.79 1216.54,732.28 1216.54,909.45 1216.54,921.26 1216.54,1011.81 1228.35,1023.62 1228.35,1062.99 v1(1248.03,1082.68)
  Bottom Layer w7.87: HDR_B.10@1248.03,606.3 v2(1248.03,665.35)
LED3: HDR_B.12 U1.AC8 | length 517.3
  Top Layer w7.87: v1(1287.4,1082.68) U1.AC8@1307.09,1102.36
  MidLayer1 w5: v2(1279.53,688.98) 1267.72,700.79 1267.72,909.45 1267.72,921.26 1267.72,1062.99 v1(1287.4,1082.68)
  Bottom Layer w7.87: HDR_B.12@1279.53,606.3 v2(1279.53,688.98)
LED4: HDR_B.14 U1.AD8 | length 474.6
  Top Layer w7.87: v1(1287.4,1043.31) U1.AD8@1307.09,1062.99
  MidLayer1 w5: v1(1287.4,1043.31) 1287.4,921.26 1287.4,909.45 1287.4,720.47 1311.02,696.85 v2(1311.02,665.35)
  Bottom Layer w7.87: HDR_B.14@1311.03,606.3 v2(1311.02,665.35)
LED5: HDR_B.16 U1.AC10 | length 520.5
  Top Layer w7.87: v1(1366.14,1082.68) U1.AC10@1385.83,1102.36
  MidLayer1 w5: v2(1342.52,688.98) 1354.33,700.79 1354.33,822.83 1346.46,830.71 1346.46,909.45 1346.46,921.26 1346.46,1062.99 v1(1366.14,1082.68)
  Bottom Layer w7.87: HDR_B.16@1342.52,606.3 v2(1342.52,688.98)
LED6: HDR_B.18 U1.AD10 | length 468.1
  Top Layer w7.87: v1(1366.14,1043.3) U1.AD10@1385.83,1062.99
  MidLayer1 w5: v1(1366.14,1043.3) 1366.14,921.26 1366.14,909.45 1366.14,842.52 1374.02,834.65 v2(1374.02,665.35)
  Bottom Layer w7.87: HDR_B.18@1374.02,606.3 v2(1374.02,665.35)
LED7: HDR_B.20 U1.AC11 | length 520.5
  Top Layer w7.87: v1(1405.51,1082.68) U1.AC11@1425.2,1102.36
  MidLayer1 w5: v2(1405.51,688.98) 1385.83,708.66 1385.83,909.45 1385.83,921.26 1385.83,1062.99 v1(1405.51,1082.68)
  Bottom Layer w7.87: HDR_B.20@1405.51,606.3 v2(1405.51,688.98)
LED_PGM: LED2.2 U9.4 | length 255.9
  Top Layer w7.87: LED2.2@1295.28,165.35 1301.18,165.35 1425.2,165.35 v1(1468.5,122.05)
  Bottom Layer w7.87: U9.4@1431.51,112.95 1435.5,111.55 U9.4@1440.94,109.65 ; U9.4@1433.07,125.98 1435.04,125.98 1438.97,122.05 v1(1468.5,122.05) ; U9.4@1440.94,104.33 U9.4@1440.94,109.65 ; U9.4@1440.94,122.05 1440.94,110.24 U9.4@1440.94,109.65
LED_PWR: LED1.1 R19.2 | length 102.8
  Top Layer w15.75: v1(1893.7,169.29) LED1.1@1935.04,169.29 LED1.1@1937.01,169.29
  Bottom Layer w15.75: v1(1893.7,169.29) R19.2@1953.23,169.29
LX: L1_PS.1 U2.1 U2.3 U2.14 U2.16 | length 719.2
  Top Layer w15.75: U2.16@2592.58,1633.25 2660.81,1633.25 v3@2669.29,1641.73 ; U2.14@2592.58,1683.25 2651.4,1683.25 ; 2653.54,1681.1 2651.4,1683.25 ; v3@2669.29,1677.17 2663.21,1683.25 2651.4,1683.25 ; 2748.03,1641.73 2756.52,1633.25 U2.1@2824.58,1633.25 ; 2748.03,1677.17 2754.11,1683.25 U2.3@2824.58,1683.25
  Bottom Layer w78.74: 2385.83,1944.88 v3(2661.42,1669.29) v3@2669.29,1669.29
  other v3: 2661.42,1641.73 2690.96,1641.73 2720.5,1641.73 2690.96,1669.29 2720.5,1669.29 2661.42,1696.85 2690.96,1696.85 2720.5,1696.85
M0: R23.2 U1.V23 | length 952.8
  Top Layer w7.87: U1.V23@1897.64,1299.21 v1(1917.33,1279.53)
  Bottom Layer w5: v1(1917.33,1279.53) 1937.01,1299.21 1937.01,1326.77 1948.82,1338.58 1972.44,1338.58 2035.43,1401.57 2035.43,1944.88 2005.91,1974.41 2005.91,2098.9 R23.2@2027.55,2120.55
M1: R18.2 U1.V21 | length 900.6
  Top Layer w7.87: U1.V21@1818.9,1299.21 v1(1838.59,1279.53)
  Bottom Layer w5: v1(1838.59,1279.53) 1858.27,1299.21 1858.27,1330.71 1866.14,1338.58 1889.76,1338.58 1897.64,1346.46 1897.64,1366.14 1909.45,1377.95 1929.13,1377.95 1937.01,1385.83 1937.01,1405.51 1948.82,1417.32 1968.5,1417.32 2011.81,1460.63 2011.81,1901.57 1940.94,1972.44 R18.2@1940.94,2014.25
M2: R28.2 U1.V24 | length 812.8
  Top Layer w7.87: U1.V24@1937.01,1299.21 v1(1956.7,1279.53)
  Bottom Layer w5: v1(1956.7,1279.53) 1956.7,1295.28 1961.65,1300.23 1969.52,1300.23 2047.24,1377.95 2047.24,1956.69 2027.55,1976.38 R28.2@2027.55,2014.25
MOUSECLOCK: HDR_T.30 U1.A16 | length 780.4
  Top Layer w5: v2(1562.99,2665.35) 1562.99,2334.64 1606.3,2291.34 1606.3,2271.65 1622.05,2255.9 1622.05,2043.31 1622.05,2031.5 U1.A16@1622.05,1968.5
  Bottom Layer w7.87: HDR_T.30@1562.99,2606.3 v2(1562.99,2665.35)
MOUSEDATA: HDR_T.32 U1.B16 | length 876.8
  Top Layer w5: v2(1594.49,2688.98) 1594.49,2338.58 1645.67,2287.4 1645.67,2271.65 1637.8,2263.78 1637.8,2248.03 1641.73,2244.09 1641.73,2043.31 1641.73,2031.5 1641.73,1948.82 U1.B16@1622.05,1929.13
  Bottom Layer w7.87: HDR_T.32@1594.49,2606.3 v2(1594.49,2688.98)
NetLED2_1: LED2.1 R21.2 | length 87.1
  Top Layer w7.87: v1(1181.1,169.29) LED2.1@1222.44,169.29
  Bottom Layer w7.87: v1(1181.1,169.29) R21.2@1226.85,169.29
NetR5_1: R5.1 U1.N3 | length 669.4
  Top Layer w7.87: v1(1090.55,1515.75) U1.N3@1110.24,1496.06
  MidLayer4 w5.98: v1(1066.93,2102.36) 1048.68,2084.11 1048.68,2014.83 1066.93,1996.58 1066.93,1539.37 v1(1090.55,1515.75)
  Bottom Layer w5.98: v1(1066.93,2102.36) R5.1@1066.93,2132.36
NetR15_2: R15.2 R16.1 | length 60
  Top Layer w13.78: R15.2@2910.94,1866.14 R16.1@2970.94,1866.14
NetRN33_8: RN33.8 RN34.5 | length 91.3
  Bottom Layer w5: RN33.8@1688.58,3271.65 RN34.5@1779.53,3271.65 RN34.5@1779.92,3271.65
NetRN35_8: RN35.8 RN36.5 | length 91.3
  Bottom Layer w5: RN35.8@1393.3,3271.65 RN36.5@1483.28,3271.66 RN36.5@1484.64,3271.65
NEXUS_TCK: HDR_T.82 U1.K21 | length 1625.5
  Top Layer w7.87: U1.K21@1818.9,1614.17 v1(1838.59,1633.86)
  MidLayer3 w5: v1(1838.59,1633.86) 1858.27,1614.17 2078.74,1614.17 2090.55,1614.17 2118.11,1614.17 2125.98,1606.3 2181.1,1606.3 2318.9,1744.09 2318.9,2035.43 2433.07,2149.61 2433.07,2263.78 2425.2,2271.65 2425.2,2381.89 2381.89,2425.2 v2(2381.89,2665.35)
  Bottom Layer w7.87: HDR_T.82@2381.89,2606.3 v2(2381.89,2665.35)
NEXUS_TDI: HDR_T.84 U1.L21 | length 1707.1
  Top Layer w7.87: U1.L21@1818.9,1574.8 v1(1838.59,1594.49)
  MidLayer3 w5: v1(1838.59,1594.49) 1858.27,1574.8 2078.74,1574.8 2090.55,1574.8 2169.29,1574.8 2330.71,1736.22 2330.71,2031.5 2444.88,2145.67 2444.88,2251.97 2464.57,2271.65 2464.57,2377.95 2413.38,2429.13 v2(2413.38,2688.98)
  Bottom Layer w7.87: HDR_T.84@2413.39,2606.3 v2(2413.38,2688.98)
NEXUS_TDO: HDR_T.76 U1.B25 | length 985.2
  Top Layer w5: U1.B25@1976.38,1929.13 1996.06,1948.82 1996.06,2031.5 1996.06,2043.31 1996.06,2047.24 2003.94,2055.12 2027.56,2055.12 2047.24,2074.8 2047.24,2118.11 2074.8,2145.67 2074.8,2259.84 2086.61,2271.65 2287.4,2472.44 v2(2287.4,2688.98)
  Bottom Layer w7.87: HDR_T.76@2287.4,2606.3 v2(2287.4,2688.98)
NEXUS_TMS: HDR_T.80 U1.J20 | length 1623.1
  Top Layer w7.87: U1.J20@1779.53,1653.54 v1(1799.21,1673.23)
  MidLayer3 w5: v1(1799.21,1673.23) 1818.9,1653.54 2078.74,1653.54 2090.55,1653.54 2137.8,1653.54 2307.09,1822.83 2307.09,2039.37 2393.7,2125.98 2393.7,2263.78 2401.57,2271.65 2401.57,2366.14 2350.39,2417.33 v2(2350.39,2688.98)
  Bottom Layer w7.87: HDR_T.80@2350.4,2606.3 v2(2350.39,2688.98)
ONE_WIRE.PIO2: U1_ID.6
ONE_WIRE_DB_PB: HDR_B.79 U1.AB11 | length 1764.6
  Top Layer w7.87: v1(1405.51,1122.05) U1.AB11@1425.2,1141.73
  MidLayer3 w5: v1(1405.51,1122.05) 1425.2,1102.36 1425.2,921.26 1425.2,909.45 1425.2,777.56 1385.83,738.19 1385.83,681.1 1740.16,326.77 2334.65,326.77 2350.39,311.02 v2(2350.39,248.03)
  Bottom Layer w7.87: v2(2350.39,248.03) HDR_B.79@2350.4,338.58
ONE_WIRE_DBID: HDR_T.92 U1_ID.2 | length 314.2
  Bottom Layer w5: HDR_T.92@2539.37,2606.3 2539.37,2678.98 2539.37,2805.12 2580.71,2846.46 U1_ID.2@2637.59,2846.45
ONE_WIRE_PIO1: HDR_T.91 U1_ID.3 | length 1180.9
  Bottom Layer w5: HDR_T.91@2539.37,2338.58 2539.37,2212.6 2559.06,2192.91 2763.78,2192.91 2787.4,2216.54 2787.4,2712.6 2751.97,2748.03 2732.28,2748.03 2712.6,2767.72 2712.6,2881.89 2698.04,2896.45 U1_ID.3@2637.59,2896.45
PROGRAMN: R24.2 U1.V22 | length 870.8
  Top Layer w7.87: U1.V22@1858.27,1299.21 v1(1877.96,1279.53)
  Bottom Layer w5: v1@1881.89,1279.53 v1(1877.96,1279.53) 1897.64,1299.21 1897.64,1330.71 1905.51,1338.58 1929.13,1338.58 1937.01,1346.46 1937.01,1366.14 1948.82,1377.95 1972.44,1377.95 2023.62,1429.13 2023.62,1929.13 1984.25,1968.51 R24.2@1984.25,2014.25
REF_1V2: C21.2 U2.10 | length 86.8
  Top Layer w15.75: C21.2@2505.9,1783.46 2506.11,1783.25 U2.10@2592.58,1783.25
REF_CLK: HDR_B.4 U1.AE14 | length 901.3
  Top Layer w5: v1(1539.37,720.47) 1562.99,744.09 1562.99,1003.94 U1.AE14@1543.31,1023.62
  MidLayer1 w5: v2(1153.54,688.98) 1153.54,665.35 1177.17,641.73 1511.81,641.73 1519.68,649.61 1519.68,673.23 1511.81,681.1 1511.81,708.66 1523.62,720.47 v1(1539.37,720.47)
  Bottom Layer w7.87: HDR_B.4@1153.55,606.3 v2(1153.54,688.98)
RS232_CTS: HDR_T.22 U1.A11 | length 803.2
  Top Layer w5: U1.A11@1425.2,1968.5 1425.2,2031.5 1425.2,2043.31 1425.2,2114.17 1488.19,2177.16 1488.19,2263.78 1480.31,2271.65 1480.31,2291.34 1437.01,2334.64 v2(1437.01,2665.35)
  Bottom Layer w7.87: HDR_T.22@1437.01,2606.3 v2(1437.01,2665.35)
RS232_RTS: HDR_T.18 U1.A10 | length 793.4
  Top Layer w5: v2(1374.01,2665.35) 1374.02,2334.65 1417.32,2291.34 1417.32,2271.65 1425.2,2263.78 1425.2,2153.54 1385.83,2114.17 1385.83,2043.31 1385.83,2031.5 U1.A10@1385.83,1968.5
  Bottom Layer w7.87: HDR_T.18@1374.02,2606.3 v2(1374.01,2665.35)
RS232_RX: HDR_T.24 U1.B12 | length 886.5
  Top Layer w5: U1.B12@1464.57,1929.13 1484.25,1948.82 1484.25,2031.5 1484.25,2043.31 1484.25,2133.86 1500,2149.61 1500,2251.97 1519.68,2271.65 1519.68,2287.4 1468.5,2338.58 v2(1468.5,2688.98)
  Bottom Layer w7.87: HDR_T.24@1468.5,2606.3 v2(1468.5,2688.98)
RS232_TX: HDR_T.20 U1.B11 | length 893.1
  Top Layer w5: v2(1405.51,2688.98) 1405.51,2338.58 1456.69,2287.4 1456.69,2271.65 1448.82,2263.78 1448.82,2157.48 1405.51,2114.17 1405.51,2043.31 1405.51,2031.5 1405.51,1948.82 U1.B11@1425.2,1929.13
  Bottom Layer w7.87: HDR_T.20@1405.51,2606.3 v2(1405.51,2688.98)
SCL: HDR_B.5 U1.AA10 | length 1090.1
  Top Layer w7.87: v1(1366.14,1161.42) U1.AA10@1385.83,1181.1
  MidLayer3 w5: v2(1185.04,279.53) 1185.04,629.92 1287.4,732.28 1338.58,732.28 1385.83,779.53 1385.83,909.45 1385.83,921.26 1385.83,1141.73 v1(1366.14,1161.42)
  Bottom Layer w7.87: v2(1185.04,279.53) HDR_B.5@1185.04,338.58
SDA: HDR_B.3 U1.AD9 | length 938.7
  Top Layer w7.87: v1(1326.77,1043.31) U1.AD9@1346.46,1062.99
  MidLayer3 w5: v2(1153.54,279.53) 1153.54,661.42 1346.46,854.33 1346.46,909.45 1346.46,921.26 1346.46,1007.87 1326.77,1027.56 v1(1326.77,1043.31)
  Bottom Layer w7.87: v2(1153.54,279.53) HDR_B.3@1153.55,338.58
SLEEP_N: HDR_T.93
SPI_CLK: HDR_T.46 U1.F14 | length 1091.4
  Top Layer w7.87: U1.F14@1543.31,1771.65 v1(1562.99,1791.34)
  MidLayer2 w5: v1(1562.99,1791.34) 1543.31,1811.03 1543.31,2031.5 1543.31,2043.31 1543.31,2047.24 1740.16,2244.09 1740.16,2263.78 1728.35,2275.59 1728.35,2295.28 1814.96,2381.89 v2(1814.96,2665.35)
  Bottom Layer w7.87: HDR_T.46@1814.96,2606.3 v2(1814.96,2665.35)
SPI_DIN: HDR_T.44 U1.F13 | length 1206.1
  Top Layer w7.87: v1(1484.25,1791.34) U1.F13@1503.94,1771.65
  MidLayer2 w5: v1(1484.25,1791.34) 1464.57,1811.02 1464.57,1866.14 1464.57,1893.7 1464.57,1940.95 1472.44,1948.82 1472.44,2031.5 1472.44,2043.31 1472.44,2196.85 1507.87,2232.28 1606.3,2232.28 1646.13,2272.11 1649.61,2275.59 1649.61,2318.9 1704.72,2374.02 1704.72,2582.68 1783.46,2661.42 v2(1783.46,2688.98)
  Bottom Layer w7.87: HDR_T.44@1783.47,2606.3 v2(1783.46,2688.98)
SPI_DOUT: HDR_T.50 U1.F16 | length 1093.1
  Top Layer w7.87: U1.F16@1622.05,1771.65 v1(1641.73,1791.34)
  MidLayer2 w5: v1(1641.73,1791.34) 1622.05,1811.02 1622.05,2031.49 1622.05,2043.31 1622.05,2086.61 1767.72,2232.28 1787.4,2232.28 1803.15,2248.03 1803.15,2263.78 1795.28,2271.65 1795.28,2291.34 1877.95,2374.01 v2(1877.95,2665.35)
  Bottom Layer w7.87: HDR_T.50@1877.95,2606.3 v2(1877.95,2665.35)
SPI_MODE: HDR_T.52 U1.F17 | length 1135.8
  Top Layer w7.87: U1.F17@1661.42,1771.65 v1(1681.1,1791.34)
  MidLayer2 w5: v1(1681.1,1791.34) 1661.42,1811.02 1661.42,2031.49 1661.42,2039.37 1661.42,2107.28 1774.61,2220.47 1803.15,2220.47 1822.83,2240.16 1822.83,2259.84 1909.45,2346.46 v2(1909.45,2688.98)
  Bottom Layer w7.87: HDR_T.52@1909.45,2606.3 v2(1909.45,2688.98)
SPI_SEL: HDR_T.48 U1.F15 | length 1125.6
  Top Layer w7.87: U1.F15@1582.68,1771.65 v1(1602.36,1791.34)
  MidLayer2 w5: v1(1602.36,1791.34) 1582.68,1811.02 1582.68,2031.49 1582.62,2043.31 1582.62,2066.87 1763.78,2248.03 1763.78,2263.78 1775.59,2275.59 1775.59,2287.4 1846.46,2358.27 v2(1846.46,2688.98)
  Bottom Layer w7.87: HDR_T.48@1846.46,2606.3 v2(1846.46,2688.98)
SRAM1_A0: U1.AD21 U1_SMB.1 | length 927.7
  Top Layer w7.87: U1.AD21@1818.9,1062.99 v1(1838.58,1043.31)
  MidLayer1 w5: v1(1838.58,1043.31) 1838.58,1023.62 1921.26,940.95 1921.26,921.26 1921.26,909.45 1921.26,893.7 2086.61,728.35 v1(2523.62,728.35)
  Bottom Layer w5: U1_SMB.1@2478.43,728.35 v1(2523.62,728.35)
SRAM1_A1: U1.AD22 U1_SMB.2 | length 927.2
  Top Layer w7.87: U1.AD22@1858.27,1062.99 v1(1877.95,1043.31)
  MidLayer1 w5: v1(1877.95,1043.31) 1877.95,1027.56 1944.88,960.63 1944.88,921.26 1944.88,909.45 1944.88,901.57 2086.61,759.84 v1(2547.24,759.84)
  Bottom Layer w5: U1_SMB.2@2478.43,759.84 v1(2547.24,759.84)
SRAM1_A2: U1.AD23 U1_SMB.3 | length 792.9
  Top Layer w7.87: U1.AD23@1897.64,1062.99 v1(1917.32,1043.31)
  MidLayer1 w5: v1(1917.32,1043.31) 1917.32,1027.56 1964.57,980.32 2078.74,980.32 2090.55,980.32 2216.54,980.32 2405.51,791.34 v1(2523.62,791.34)
  Bottom Layer w5: U1_SMB.3@2478.43,791.34 v1(2523.62,791.34)
SRAM1_A3: U1.AD24 U1_SMB.4 | length 778.5
  Top Layer w7.87: U1.AD24@1937.01,1062.99 v1(1956.69,1043.31)
  MidLayer1 w5: v1(1956.69,1043.31) 2078.74,1043.31 2090.55,1043.31 2192.91,1043.31 2413.39,822.83 v1(2547.24,822.83)
  Bottom Layer w5: U1_SMB.4@2478.43,822.84 v1(2547.24,822.83)
SRAM1_A4: U1.AC24 U1_SMB.5 | length 734.5
  Top Layer w7.87: U1.AC24@1937.01,1102.36 v1(1956.69,1082.68)
  MidLayer1 w5: v1(1956.69,1082.68) 1984.25,1055.12 2078.74,1055.12 2090.55,1055.12 2200.79,1055.12 2401.57,854.33 v1(2523.62,854.33)
  Bottom Layer w5: U1_SMB.5@2478.43,854.33 v1(2523.62,854.33)
SRAM1_A5: U1.AA22 U1_SMB.18 | length 781.8
  Top Layer w7.87: U1.AA22@1858.27,1181.1 v1(1877.96,1161.42)
  MidLayer4 w5: v1(1877.96,1161.42) 1897.64,1141.73 2078.74,1141.73 2090.55,1141.73 2177.17,1141.73 2299.2,1263.77 v1(2523.83,1263.77)
  Bottom Layer w5: U1_SMB.18@2478.44,1263.77 v1(2523.83,1263.77) v1@2527.77,1263.77
SRAM1_A6: U1.AA21 U1_SMB.19 | length 864.7
  Top Layer w7.87: U1.AA21@1818.9,1181.1 v1(1838.59,1161.42)
  MidLayer4 w5: v1(1838.59,1161.42) 1858.27,1181.1 2078.74,1181.1 2090.55,1181.1 2181.1,1181.1 2295.28,1295.28 v1(2547.24,1295.28)
  Bottom Layer w5: U1_SMB.19@2478.43,1295.28 v1(2547.24,1295.28) v1@2551.18,1295.28
SRAM1_A7: U1.W22 U1_SMB.20 | length 775.2
  Top Layer w7.87: U1.W22@1858.27,1259.84 v1(1877.96,1240.16)
  MidLayer4 w5: v1(1877.96,1240.16) 1897.64,1220.47 2078.74,1220.47 2090.55,1220.47 2181.1,1220.47 2287.4,1326.77 v1(2523.83,1326.76)
  Bottom Layer w5: U1_SMB.20@2478.43,1326.77 v1(2523.83,1326.76) v1@2527.77,1326.76
SRAM1_A8: U1.R21 U1_SMB.21 | length 847.9
  Top Layer w7.87: U1.R21@1818.9,1417.32 v1(1838.59,1397.64)
  MidLayer4 w5: v1(1838.59,1397.64) 1858.27,1417.32 2078.74,1417.32 2090.55,1417.32 2125.98,1417.32 2185.04,1358.27 v1(2547.24,1358.27)
  Bottom Layer w5: U1_SMB.21@2472.44,1358.27 U1_SMB.21@2478.43,1358.27 v1(2547.24,1358.27) v1@2551.18,1358.27
SRAM1_A9: U1.N23 U1_SMB.22 | length 731.9
  Top Layer w7.87: U1.N23@1897.64,1496.06 v1(1917.33,1515.75)
  MidLayer4 w5: v1(1917.33,1515.75) 2078.74,1515.75 2090.55,1515.75 2181.1,1515.75 2307.1,1389.75 v1(2523.83,1389.75)
  Bottom Layer w5: U1_SMB.22@2478.43,1389.76 v1(2523.83,1389.75)